# Altium PCB CCSL_PCB.PcbDoc
Units mil, origin at the board's own origin, x right, y up, seen from the top; angles counter-clockwise.
Board outline 3740.03 x 2480.03 mil, 2 copper layers (Top Layer, Bottom Layer); 25 components, 24 nets, 102 pads, 6 vias.
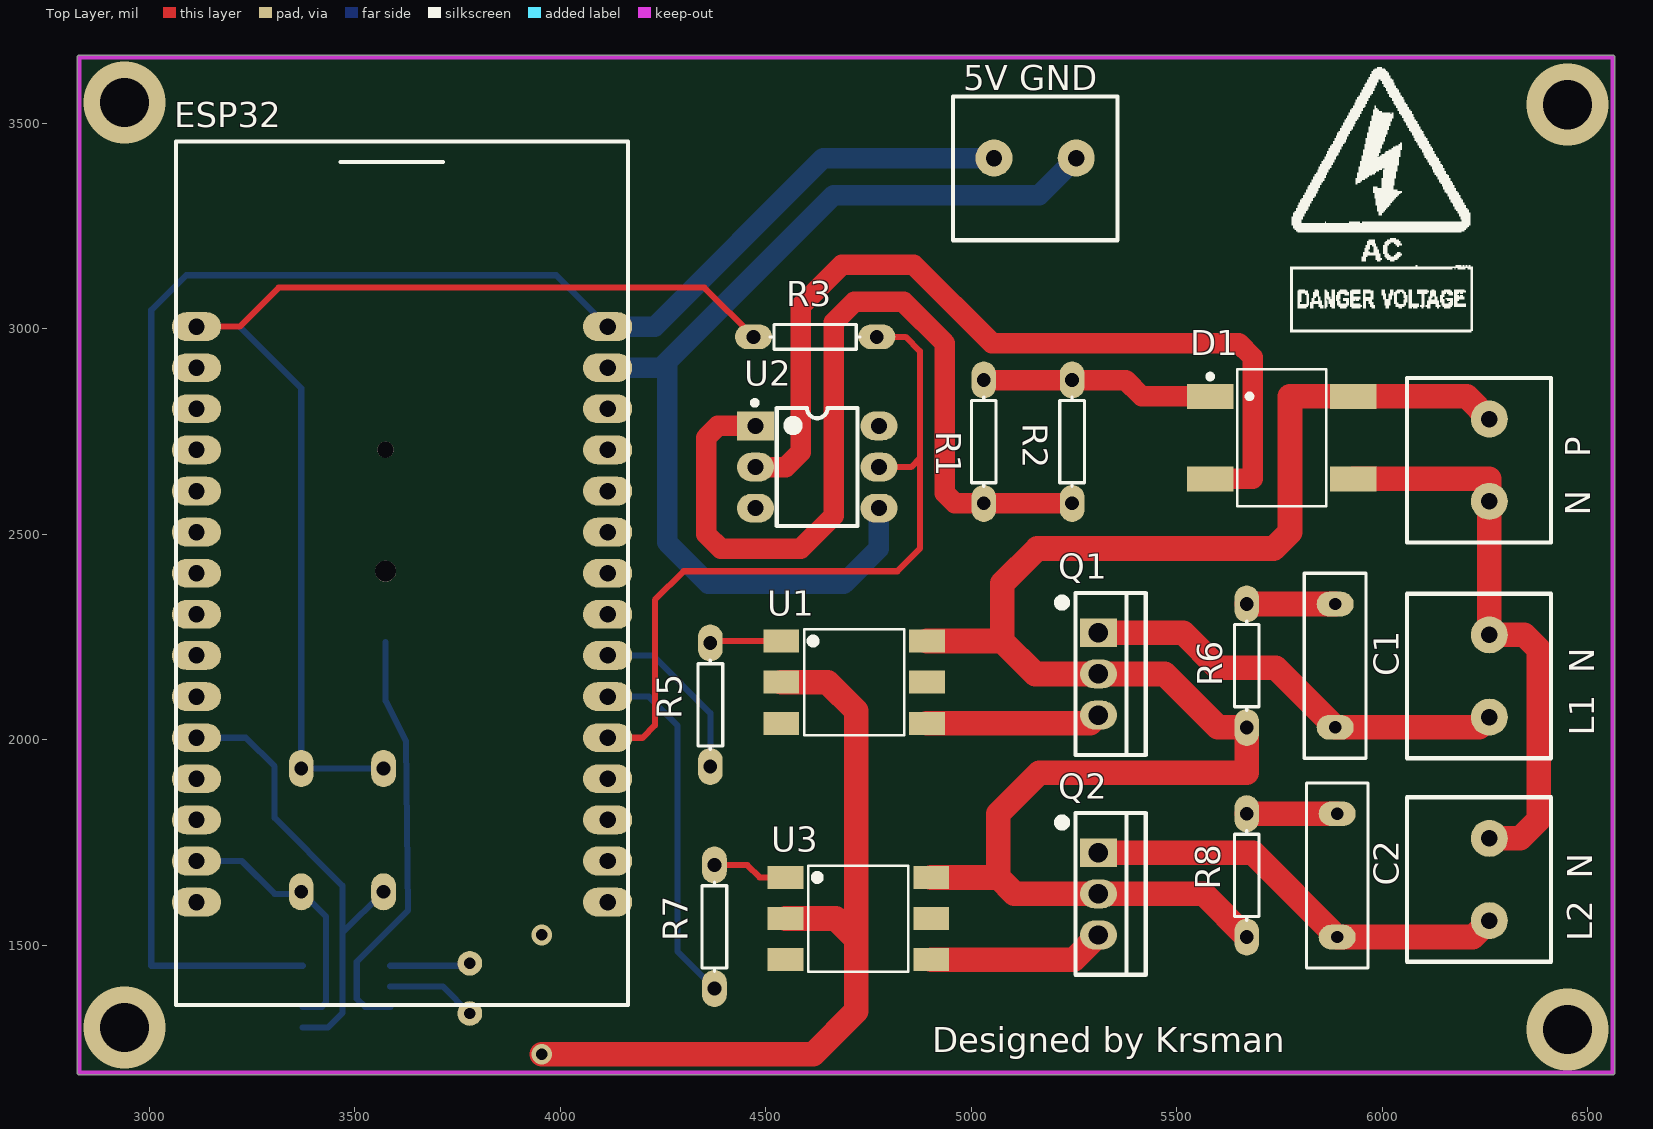
[diagram p0: Top Layer view]
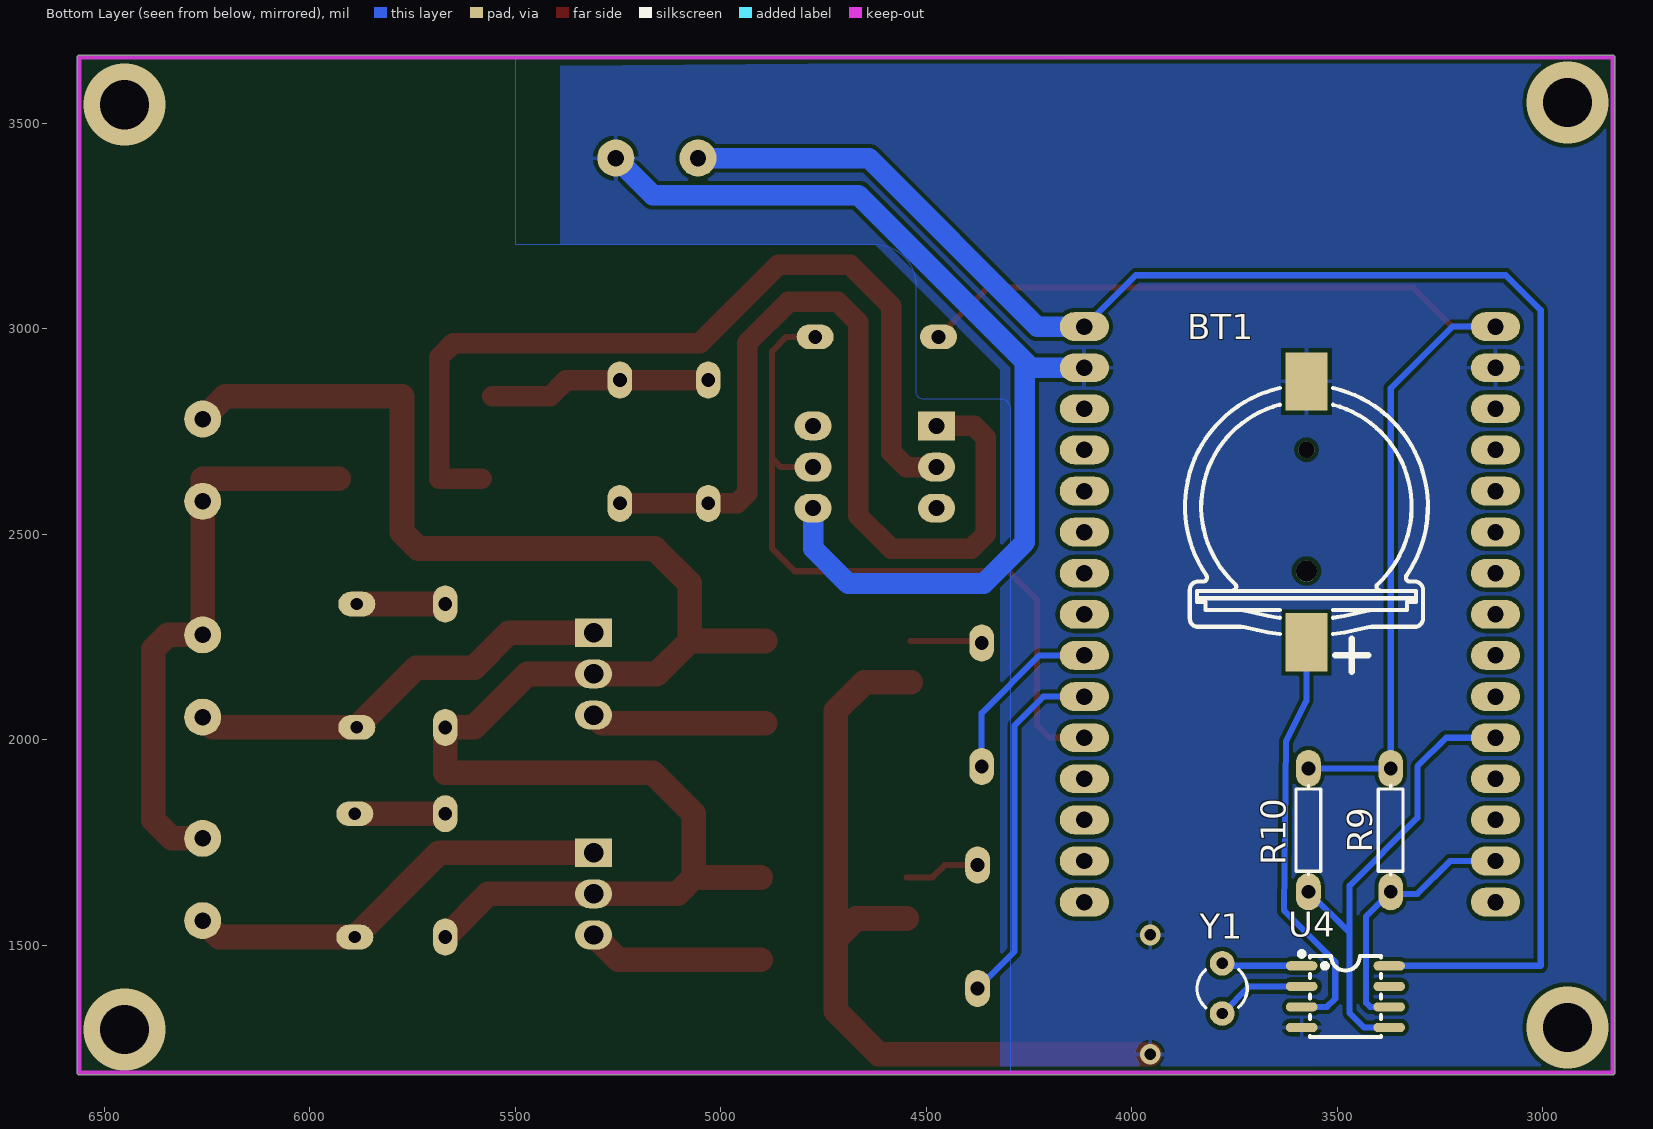
[diagram p1: Bottom Layer view, seen from below]

## Layer stack, top to bottom
Top Layer: signal copper 1.4
Dielectric: dielectric 12.6, FR-4, Dk 4.8
Bottom Layer: signal copper 1.4

## Board outline
2824.99,1190 ccw(c2830,1190) 2830,1184.98 6560,1184.98 ccw(c6560,1190) 6565.02,1190 6565.02,3660 ccw(c6560,3660) 6560,3665.01 2830,3665.01 ccw(c2830,3660) 2824.99,3660

## Design rules (kind name [scope] priority, off if disabled: settings)
Clearance [All] p1: gap=10
PolygonConnect [All] p1: connectstyle=Relief reliefconductorwidth=10 reliefentries=4 polygonreliefangle="90 Angle" airgapwidth=10
RoutingVias [All] p1: holewidth=28 width=50 viastyle="Through Hole" minholewidth=28 minwidth=50 maxholewidth=28 maxwidth=50
SolderMaskExpansion [All] p1: expansion=4
Width [All] p1: maxlimit=80 minlimit=15 preferedwidth=30 minimp=50.000000 maximp=50.000000 favimp=50.000000
28 further rules are at their usual default settings.

## Components (designator, comment, footprint, x,y, rotation, side; value= is the part's Value field where it differs from the comment)
"5V GND" "Klema" Klema 5155,3415 r180 top (schematic designator Supply)
BT1 "Battery" BAT-SMD_KEYSTONE-1056 3575,2550 r270 bottom
C1 "Cap" RAD-0.3 5885,2180 r90 top
C2 "Cap" RAD-0.3 5890,1670 r90 top
D1 "DF1504S-T" DF-S_L8.4-W6.4-P5.10-LS10.4-TR 5755,2735 r90 top
ESP32 "ESP32 DEV KIT MODULE" ESP32 3615,2305 r180 top
"L1  N" "Klema" Klema 6260,2155 r90 top (schematic designator Load1)
"L2  N" "Klema" Klema 6260,1660 r90 top (schematic designator Load2)
"N   P" "Klema" Klema 6260,2680 r90 top (schematic designator AC_Input)
Q1 "BTA16-600B_C5452761" TO-220-3_L10.0-W4.5-P2.54-L_1 5320,2160 r270 top
Q2 "BTA16-600B_C5452761" TO-220-3_L10.0-W4.5-P2.54-L_1 5320,1625 r270 top
R1 "Res1" AXIAL-0.3 5030,2725 r270 top
R2 "Res1" AXIAL-0.3 5245,2725 r270 top
R3 "Res1" AXIAL-0.3 4620,2980 r180 top
R5 "Res1" AXIAL-0.3 4365,2085 r90 top
R6 "Res1" AXIAL-0.3 5670,2180 r270 top
R7 "Res1" AXIAL-0.3 4375,1545 r90 top
R8 "Res1" AXIAL-0.3 5670,1670 r270 top
R9 "Res1" AXIAL-0.3 3370,1780 r270 bottom
R10 "Res1" AXIAL-0.3 3570,1780 r270 bottom
U1 "MOC3021XSM" SMD-6_L7.2-W6.4-P2.54-LS10.0-BL 4715,2140 r270 top
U2 "4N25-X000" DIP-6_L7.3-W6.5-P2.54-LS7.6-BL 4625,2670 r270 top
U3 "MOC3021XSM" SMD-6_L7.2-W6.4-P2.54-LS10.0-BL 4725,1565 r270 top
U4 "DS1307Z+T&amp;R" SOIC-8_L5.0-W4.0-P1.27-LS6.0-BL 3480,1375 r270 bottom
Y1 "XTAL" R38 3780,1395 r180 bottom

## Footprints (in the part's own frame and the unit in brackets; to place one, negate y for a bottom-side part, rotate by r counter-clockwise, add the part's x,y. Pads: shape width x height; smd on the part's side, far side on the other; paste and mask are expansions set on the pad)
AXIAL-0.3 [mil] "Axial Device, Thru-Hole; 2 Leads; 0.3 in Pin Spacing"
  oval 90x60 hole 33.46: 1(-150,0) 2(150,0)
  silkscreen extent -109,-30 109,30
BAT-SMD_KEYSTONE-1056 [mm]
  rect 3.6x2.6 smd paste+0 mask+0.051: 1(7.951,0.003) 2(-8.171,0.003)
  round 1 hole 1 unplated paste+0: ""(-3.949,0.003)
  round 1.3 hole 1.3 unplated paste+0: ""(3.551,0.003)
  silkscreen extent -7.76,-7.5 9.78,7.5
DF-S_L8.4-W6.4-P5.10-LS10.4-TR [mm]
  rect 1.54x2.89 smd paste+0 mask+0.051: 1(2.55,4.42) 2(-2.55,-4.42) 3(-2.55,4.42) 4(2.55,-4.42)
  silkscreen extent -4.24,-2.75 4.24,4.57
DIP-6_L7.3-W6.5-P2.54-LS7.6-BL [mil]
  rect 70x90 hole 39.37 paste+0 mask+2: 1(-93.35,-150)
  oval 70x90 hole 39.37 paste+0 mask+2: 2(6.65,-150) 3(106.65,-150) 4(106.65,150) 5(6.65,150) 6(-93.35,150)
  silkscreen extent -155,-158 150,98
ESP32 [mil]
  oval 120x70 hole 40: 1(-500,700) 2(-500,600) 3(-500,500) 4(-500,400) 5(-500,300) 6(-500,200) 7(-500,100) 8(-500,0) 9(-500,-100) 10(-500,-200) 11(-500,-300) 12(-500,-400) 13(-500,-500) 14(-500,-600) 15(-500,-700) 16(500,-700) 17(500,-600) 18(500,-500) 19(500,-400) 20(500,-300) 21(500,-200) 22(500,-100) 23(500,0) 24(500,100) 25(500,200) 26(500,300) 27(500,400) 28(500,500) 29(500,600) 30(500,700)
  silkscreen extent -550,-1150 550,950
Klema [mil]
  round 90 hole 40: 1(-100,0) 2(100,0)
  silkscreen extent -200,-150 200,200
R38 [mil] "Crystal, Thru-Hole; 2 Leads; Body 3.1 x 8.2 mm (Dia.xH)"
  round 60 hole 27.56: 1(0,61.02) 2(0,-61.02)
  silkscreen extent -61,-47 61,46
RAD-0.3 [mil] "Radial Cap, Thru-Hole; 2 Leads; 0.3 in Pin Spacing"
  oval 60x90 hole 30: 1(-150,0) 2(150,0)
  silkscreen extent -225,-75 225,75
SMD-6_L7.2-W6.4-P2.54-LS10.0-BL [mm]
  rect 1.422x2.2 smd paste+0 mask+0.051: 1(-2.54,-4.5) 2(0,-4.5) 3(2.54,-4.5) 4(2.54,4.5) 5(0,4.5) 6(-2.54,4.5)
  silkscreen extent -3.28,-3.1 3.28,3.1
SOIC-8_L5.0-W4.0-P1.27-LS6.0-BL [mil]
  oval 22.38x76.78 smd: 1(-75,-106.5) 2(-25,-106.5) 3(25,-106.5) 4(75,-106.5) 5(75,106.5) 6(25,106.5) 7(-25,106.5) 8(-75,106.5)
  silkscreen extent -110,-112 98,87
TO-220-3_L10.0-W4.5-P2.54-L_1 [mil]
  rect 70x90 hole 47.24 paste+0 mask+2: 1(-100,-10.86)
  oval 70x90 hole 47.24 paste+0 mask+2: 2(0,-10.86) 3(100,-10.86)
  silkscreen extent -197,-109 197,104

## Part data
"5V GND" "L1  N" "L2  N" "N   P": "2 pina"
BT1: "Multicell Battery"
C1 C2: "Capacitor"
ESP32: library part ESP32
R1 R2 R3 R5 R6 R7 R8 R9 R10: "Resistor"
Y1: "Crystal Oscillator"

## Via types
v1: diameter 200, hole 120, Top Layer to Bottom Layer, 4 vias
v2: diameter 50, hole 28, Top Layer to Bottom Layer, 2 vias

## Nets (pads, with @x,y where several pads share a name; then routed paths per layer and width w, separated by ;. In a path a pad name is that pad's centre, name@x,y a point inside that pad or via, vN(x,y) a via of type N, cw(c..) or ccw(c..) an arc to the next point about the centre after c; other vN are vias at no path point)
3V3: ESP32.16 R3.2 R9.1 R10.1 | length 2886.2
  Top Layer w15: ESP32.16 3220,3005 3315,3100 4350,3100 R3.2
  Bottom Layer w15: ESP32.16 3220,3005 3370,2855 R9.1 R10.1
5V: "5V GND.2" ESP32.15 U4.8 | length 4260.3
  Bottom Layer w15: U4.8 3005,1450 3005,3045 3090,3130 3990,3130 ESP32.15
  Bottom Layer w50: ESP32.15 4230,3005 4640,3415 5045,3415
DIMMER1: ESP32.7 R5.1 | length 438
  Bottom Layer w15: ESP32.7 4225,2205 4365,2065 R5.1
DIMMER2: ESP32.6 R7.1 | length 876.3
  Bottom Layer w15: ESP32.6 4215,2105 4285,2035 4285,1485 R7.1
GND: "5V GND.1" BT1.2 ESP32.14 ESP32.17 U1.2 U2.4 U3.2 U4.4 | length 4423.8
  Top Layer w60: v2(3955,1235) 4615,1235 4720,1340 4720,1515 ; U1.2 4650,2140 4720,2070 4720,1515 ; U3.2 4670,1565 4720,1515
  Bottom Layer w50: ESP32.14 4245,2905 ; U2.4 4775,2465 4690,2380 4360,2380 4260,2480 4260,2905 4245,2905 ; 5255,3415 5165,3325 4665,3325 4245,2905
  other v2: 3955,1525
N: "L1  N.2" "L2  N.2" "N   P.1" D1.2 | length 1398.7
  Top Layer w60: D1.2 6260,2634.61 6260,2580 6260,2255 6345,2255 6380,2220 6380,1805 6335,1760 6260,1760
NetBT1_1: BT1.1 U4.3 | length 1020.3
  Bottom Layer w15: BT1.1 3575,2095 3625,1995 3629.75,1584.75 3505,1460 3505,1370 3525,1350 U4.3
NetC1_1: "L1  N.1" C1.1 Q1.1 | length 1056.5
  Top Layer w60: Q1.1 5515,2260 5600,2175 5740,2175 C1.1 6235,2030 6260,2055
NetC1_2: C1.2 R6.1 | length 215
  Top Layer w60: R6.1 C1.2
NetC2_1: "L2  N.1" C2.1 Q2.1 | length 1052.3
  Top Layer w60: Q2.1 5685,1725 C2.1 6220,1520 6260,1560
NetC2_2: C2.2 R8.1 | length 220
  Top Layer w60: R8.1 C2.2
NetD1_1: D1.1 R1.1 R2.1 | length 542.4
  Top Layer w50: R1.1 R2.1 5375,2875 5414.61,2835.39 D1.1@5555.98,2835.39
NetD1_3: D1.3 U2.2 | length 2113.7
  Top Layer w50: U2.2 4548.35,2663.35 4585,2700 4585,3055 4685,3155 4860,3155 5050,2965 5650,2965 5684.61,2930.39 5684.61,2634.61 D1.3
NetQ1_3: Q1.3 U1.4 | length 425.3
  Top Layer w60: U1.4 5289.14,2040 Q1.3
NetQ2_3: Q2.3 U3.4 | length 431.8
  Top Layer w60: U3.4 5249.14,1465 Q2.3
NetR1_2: R1.2 R2.2 U2.1 | length 2211.9
  Top Layer w50: U2.1 4383.35,2763.35 4355,2735 4355,2500 4390,2465 4585,2465 4665,2545 4665,3015 4715,3065 4835,3065 4935,2965 4935,2600 4960,2575 R1.2 R2.2
NetR5_2: R5.2 U1.1 | length 172.8
  Top Layer w15: R5.2@4365,2240 U1.1
NetR7_2: R7.2 U3.1 | length 185.3
  Top Layer w15: R7.2 4455,1695 4485,1665 U3.1
NetU4_1: U4.1 Y1.1 | length 187.5
  Bottom Layer w15: U4.1 Y1.1@3773.98,1450
NetU4_2: U4.2 Y1.2 | length 220.8
  Bottom Layer w15: U4.2 3713.98,1400 Y1.2
P: "N   P.2" D1.4 Q1.2 Q2.2 R6.2 R8.2 U1.6 U3.6 | length 4334
  Top Layer w60: U1.6 5075,2240 ; U3.6 5065,1665 ; R8.2 5565,1625 Q2.2 5105,1625 5065,1665 ; 6260,2780 6204.61,2835.39 D1.4 5775.39,2835.39 5775,2835 5775,2505 5735,2465 5160,2465 5075,2380 5075,2240 ; 5065,1665 5065,1820 5165,1920 5670,1920 R6.2 5600,2030 5470,2160 Q1.2 5155,2160 5075,2240
SCL: ESP32.29 R9.2 U4.6 | length 638.6
  Bottom Layer w15: ESP32.29 3225,1705 3305,1625 R9.2@3365,1625 ; R9.2 3430,1570 3430,1360 3420,1350 U4.6
SDA: ESP32.26 R10.2 U4.5 | length 1139.8
  Bottom Layer w15: ESP32.26 3235,2005 3305,1935 3305,1810 3470,1645 3470,1530 ; U4.5 3435,1300 3470,1335 3470,1530 ; R10.2 3470,1530
ZEROCROSS: ESP32.5 R3.1 U2.5 | length 1837.7
  Top Layer w15: ESP32.5 4200,2005 4230,2035 4230,2340 4300,2410 4820,2410 4875,2465 4875,2685 ; R3.1 4840,2980 4875,2945 4875,2685 ; U2.5 4853.35,2663.35 4875,2685
pads on no net: BT1. ESP32.1 ESP32.2 ESP32.3 ESP32.4 ESP32.8 ESP32.9 ESP32.10 ESP32.11 ESP32.12 ESP32.13 ESP32.18 ESP32.19 ESP32.20 ESP32.21 ESP32.22 ESP32.23 ESP32.24 ESP32.25 ESP32.27 ESP32.28 ESP32.30 U1.3 U1.5 U2.3 U2.6 U3.3 U3.5 U4.7
copper on no net:
  other v1: 6450,1295 2940,1300 6450,3545 2940,3550

## Polygon pours and split planes (outlines as drawn)
GND on Bottom Layer "Top Layer-No Net 1" (solid, remove dead copper, shelved, pour order 10): 5500,3655 5500,3205 4690,3205 4625,3205 ccw(c4625,3105) 4525,3105 4525,2845 cw(c4510,2845) 4510,2830 4320,2830 ccw(c4320,2805) 4295,2805 4295,1275 4295,1195 2830,1190 2830,3660
GND on Bottom Layer "Top Layer-No Net" (solid, remove dead copper, shelved, pour order 3): 2824.99,1190 ccw(c2830,1190) 2830,1184.98 6560,1184.98 ccw(c6560,1190) 6565.02,1190 6565.02,3660 ccw(c6560,3660) 6560,3665.01 2830,3665.01 ccw(c2830,3660) 2824.99,3660
GND on Bottom Layer "Top Layer-No Net 1" (solid, remove dead copper, pour order 12): 5390,3640 5390,3205 4625,3205 4320,2900 4320,2880 4320,1190 2835,1190 2835,3655 2830,3660

## Keep-outs
Keep-Out Layer:
  lines w10: 2830,1190 6560,1190 6560,3660 2830,3660 2830,1190

## Silkscreen, mask and mechanical layers (free items; w line width, h text height)
Top Overlay:
  drawing of 18 lines, arcs and shapes, not listed
  text "Designed by Krsman" at 4905,1240 h60